# EAGLE board Simon_schematic (EAGLE 9.7.0)

Size 136.88 x 96.86 mm. Coordinates in mm from the lower left corner, seen from the top.
Outline: 0,0 136.88,0 136.88,96.86 0,96.86 0,0
Copper layers (1*16): Top 0.035mm / dielectric 1.5mm / Bottom 0.035mm
Design rules "default": minimum track width 6mil, minimum drill 0.35mm, track to track 6mil, track to pad 6mil, pad to pad 6mil, via to via 6mil, smd to smd 6mil, copper to edge 40mil, drill to drill 6mil, minimum pad ring 10mil, minimum via ring 8mil, stop-mask expansion 4mil, vias tented up to drill 0mil, thermal gap 10mil

## Footprints (pad centres in the part's own frame; a part is rotated, then mirrored left to right if it is on the bottom)
LEDRD254W60D565H860B_G = drill 0.981 pad 1.581: 1 -1.27,0; 2 1.27,0
LEDRD254W60D565H860B = drill 0.981 pad 1.581: 1 -1.27,0; 2 1.27,0
LEDRD254W60D565H860B_Y = drill 0.981 pad 1.581: 1 -1.27,0; 2 1.27,0
LEDRD254W60D565H860B_B = drill 0.981 pad 1.581: 1 -1.27,0; 2 1.27,0
PIEZO = drill 1 pad 1.6: 1 -3.5,0; 2 3.5,0
RESAD1016W63L850D250B = drill 0.83 pad 1.43: 1 -5.08,0; 2 5.08,0
HA-06-SM065 = drill 1 pad 1.676: 1 -2.54,-2.54; 2 0,2.54; 3 2.54,-2.54
SWITCH-MOMENTARY-PTH-6.5MM = drill 1.016 pad 1.88: 1 -3.251,2.261; 2 3.251,2.261; 3 -3.251,-2.261; 4 3.251,-2.261
ARDUINO-UNO-R3-SHIELD = drill 1.016 pad 1.88: 3.3V 24.13,-2.54; 5V 24.13,0; A0 24.13,12.7; A1 24.13,15.24; A2 24.13,17.78; A3 24.13,20.32; A4 24.13,22.86; A5 24.13,25.4; AREF -24.13,-13.97; D2 -24.13,20.32; D3 -24.13,17.78; D4 -24.13,15.24; D5 -24.13,12.7; D6 -24.13,10.16; D7 -24.13,7.62; D8 -24.13,3.81; D9 -24.13,1.27; D10 -24.13,-1.27; D11 -24.13,-3.81; D12 -24.13,-6.35; D13 -24.13,-8.89; GND@0 24.13,2.54; GND@1 24.13,5.08; GND@2 -24.13,-11.43; IOREF 24.13,-7.62; NC 24.13,-10.16; RES 24.13,-5.08; RX -24.13,25.4; SCL -24.13,-19.05; SDA -24.13,-16.51; TX -24.13,22.86; VIN 24.13,7.62
7SEG-X4-I2C = drill 1.016 long: P$1 -3.81,0; P$2 -1.27,0; P$3 1.27,0; P$4 3.81,0

## Placement (x,y rotation side)
D5  GREEN  [LEDRD254W60D565H860B_G]  91.72,69.01 150 top
D6  RED  [LEDRD254W60D565H860B]  84.1,69.01 150 top
D7  YELLOW  [LEDRD254W60D565H860B_Y]  99.34,69.01 150 top
D8  BLUE  [LEDRD254W60D565H860B_B]  106.96,69.01 150 top
PIEZO2  PIEZO  [PIEZO]  123.3,59.48 270 top
R9  10k  [RESAD1016W63L850D250B]  87.74,55.67 0 top
R10  10k  [RESAD1016W63L850D250B]  95.36,53.13 0 top
R11  10k  [RESAD1016W63L850D250B]  102.98,55.67 0 top
R12  10k  [RESAD1016W63L850D250B]  110.6,53.13 0 top
R13  100  [RESAD1016W63L850D250B]  85.2,81.07 270 top
R14  100  [RESAD1016W63L850D250B]  92.82,81.07 270 top
R15  100  [RESAD1016W63L850D250B]  100.44,81.07 270 top
R16  100  [RESAD1016W63L850D250B]  108.06,81.07 270 top
RPOT2  250k  [HA-06-SM065]  115.68,73.45 0 top
S5  SWITCH_MOMENTARY  [SWITCH-MOMENTARY-PTH-6.5MM]  85.2,62.02 90 top
S6  SWITCH_MOMENTARY  [SWITCH-MOMENTARY-PTH-6.5MM]  92.82,62.02 90 top
S7  SWITCH_MOMENTARY  [SWITCH-MOMENTARY-PTH-6.5MM]  100.44,62.02 90 top
S8  SWITCH_MOMENTARY  [SWITCH-MOMENTARY-PTH-6.5MM]  108.06,62.02 90 top
U2  ARDUINO-UNO-R3-SHIELD  [ARDUINO-UNO-R3-SHIELD]  47.88,67.01 270 top
U3  BLUE  [7SEG-X4-I2C]  103.01,29.84 0 top

## Library data of the parts
D5 = Tinkercad; CATEGORY: Opto-Electronic; SUB-CATEGORY: LED; VALUE: LED_GREEN
D6 = Tinkercad; CATEGORY: Opto-Electronic; SUB-CATEGORY: LED; VALUE: LED_RED
D7 = Tinkercad; CATEGORY: Opto-Electronic; SUB-CATEGORY: LED; VALUE: LED_YELLOW
D8 = Tinkercad; CATEGORY: Opto-Electronic; SUB-CATEGORY: LED; VALUE: LED_BLUE
PIEZO2 R9-R16 RPOT2 S5-S8 U2 U3 = Tinkercad

## Nets
D5_A: D5.1 R14.2
D6_A: D6.1 R13.2
D7_A: D7.1 R15.2
D8_A: D8.1 R16.2
U2_5V: RPOT2.1 S5.3 S5.4 S6.3 S6.4 S7.3 S7.4 S8.3 S8.4 U2.5V U3.P$1
U2_A0: RPOT2.2 U2.A0
U2_D2: R13.1 U2.D2
U2_D3: R14.1 U2.D3
U2_D4: R15.1 U2.D4
U2_D5: R16.1 U2.D5
U2_D6: R9.1 S5.1 S5.2 U2.D6
U2_D7: R10.1 S6.1 S6.2 U2.D7
U2_D8: R11.1 S7.1 S7.2 U2.D8
U2_D9: R12.1 S8.1 S8.2 U2.D9
U2_D13: PIEZO2.1 U2.D13
U2_GND: D5.2 D6.2 D7.2 D8.2 PIEZO2.2 R9.2 R10.2 R11.2 R12.2 RPOT2.3 U2.GND@0 U2.GND@1 U2.GND@2 U3.P$2
U2_SCL: U2.SCL U3.P$4
U2_SDA: U2.SDA U3.P$3

## Tracks (layer width: path | path; a pad name or v marks a point on that pad's centre or on a via)
D5_A  (1 unrouted)
D6_A  (1 unrouted)
D7_A  (1 unrouted)
D8_A  (1 unrouted)
U2_5V  (10 unrouted)
U2_A0  (1 unrouted)
U2_D2  (1 unrouted)
U2_D3  (1 unrouted)
U2_D4  (1 unrouted)
U2_D5  (1 unrouted)
U2_D6  (3 unrouted)
U2_D7  (3 unrouted)
U2_D8  (3 unrouted)
U2_D9  (3 unrouted)
U2_D13  (1 unrouted)
U2_GND  (13 unrouted)
U2_SCL  (1 unrouted)
U2_SDA  (1 unrouted)